# Altium PCB Driver_S_Comm.PcbDoc (part 2 of 5)
Units mm, origin at the board's own origin, x right, y up, seen from the top; angles counter-clockwise.
Board outline 200.2 x 290.2 mm, 2 copper layers (Top Layer, Bottom Layer), stack 1.371 mm thick; 518 components, 197 nets, 1403 pads, 323 vias.
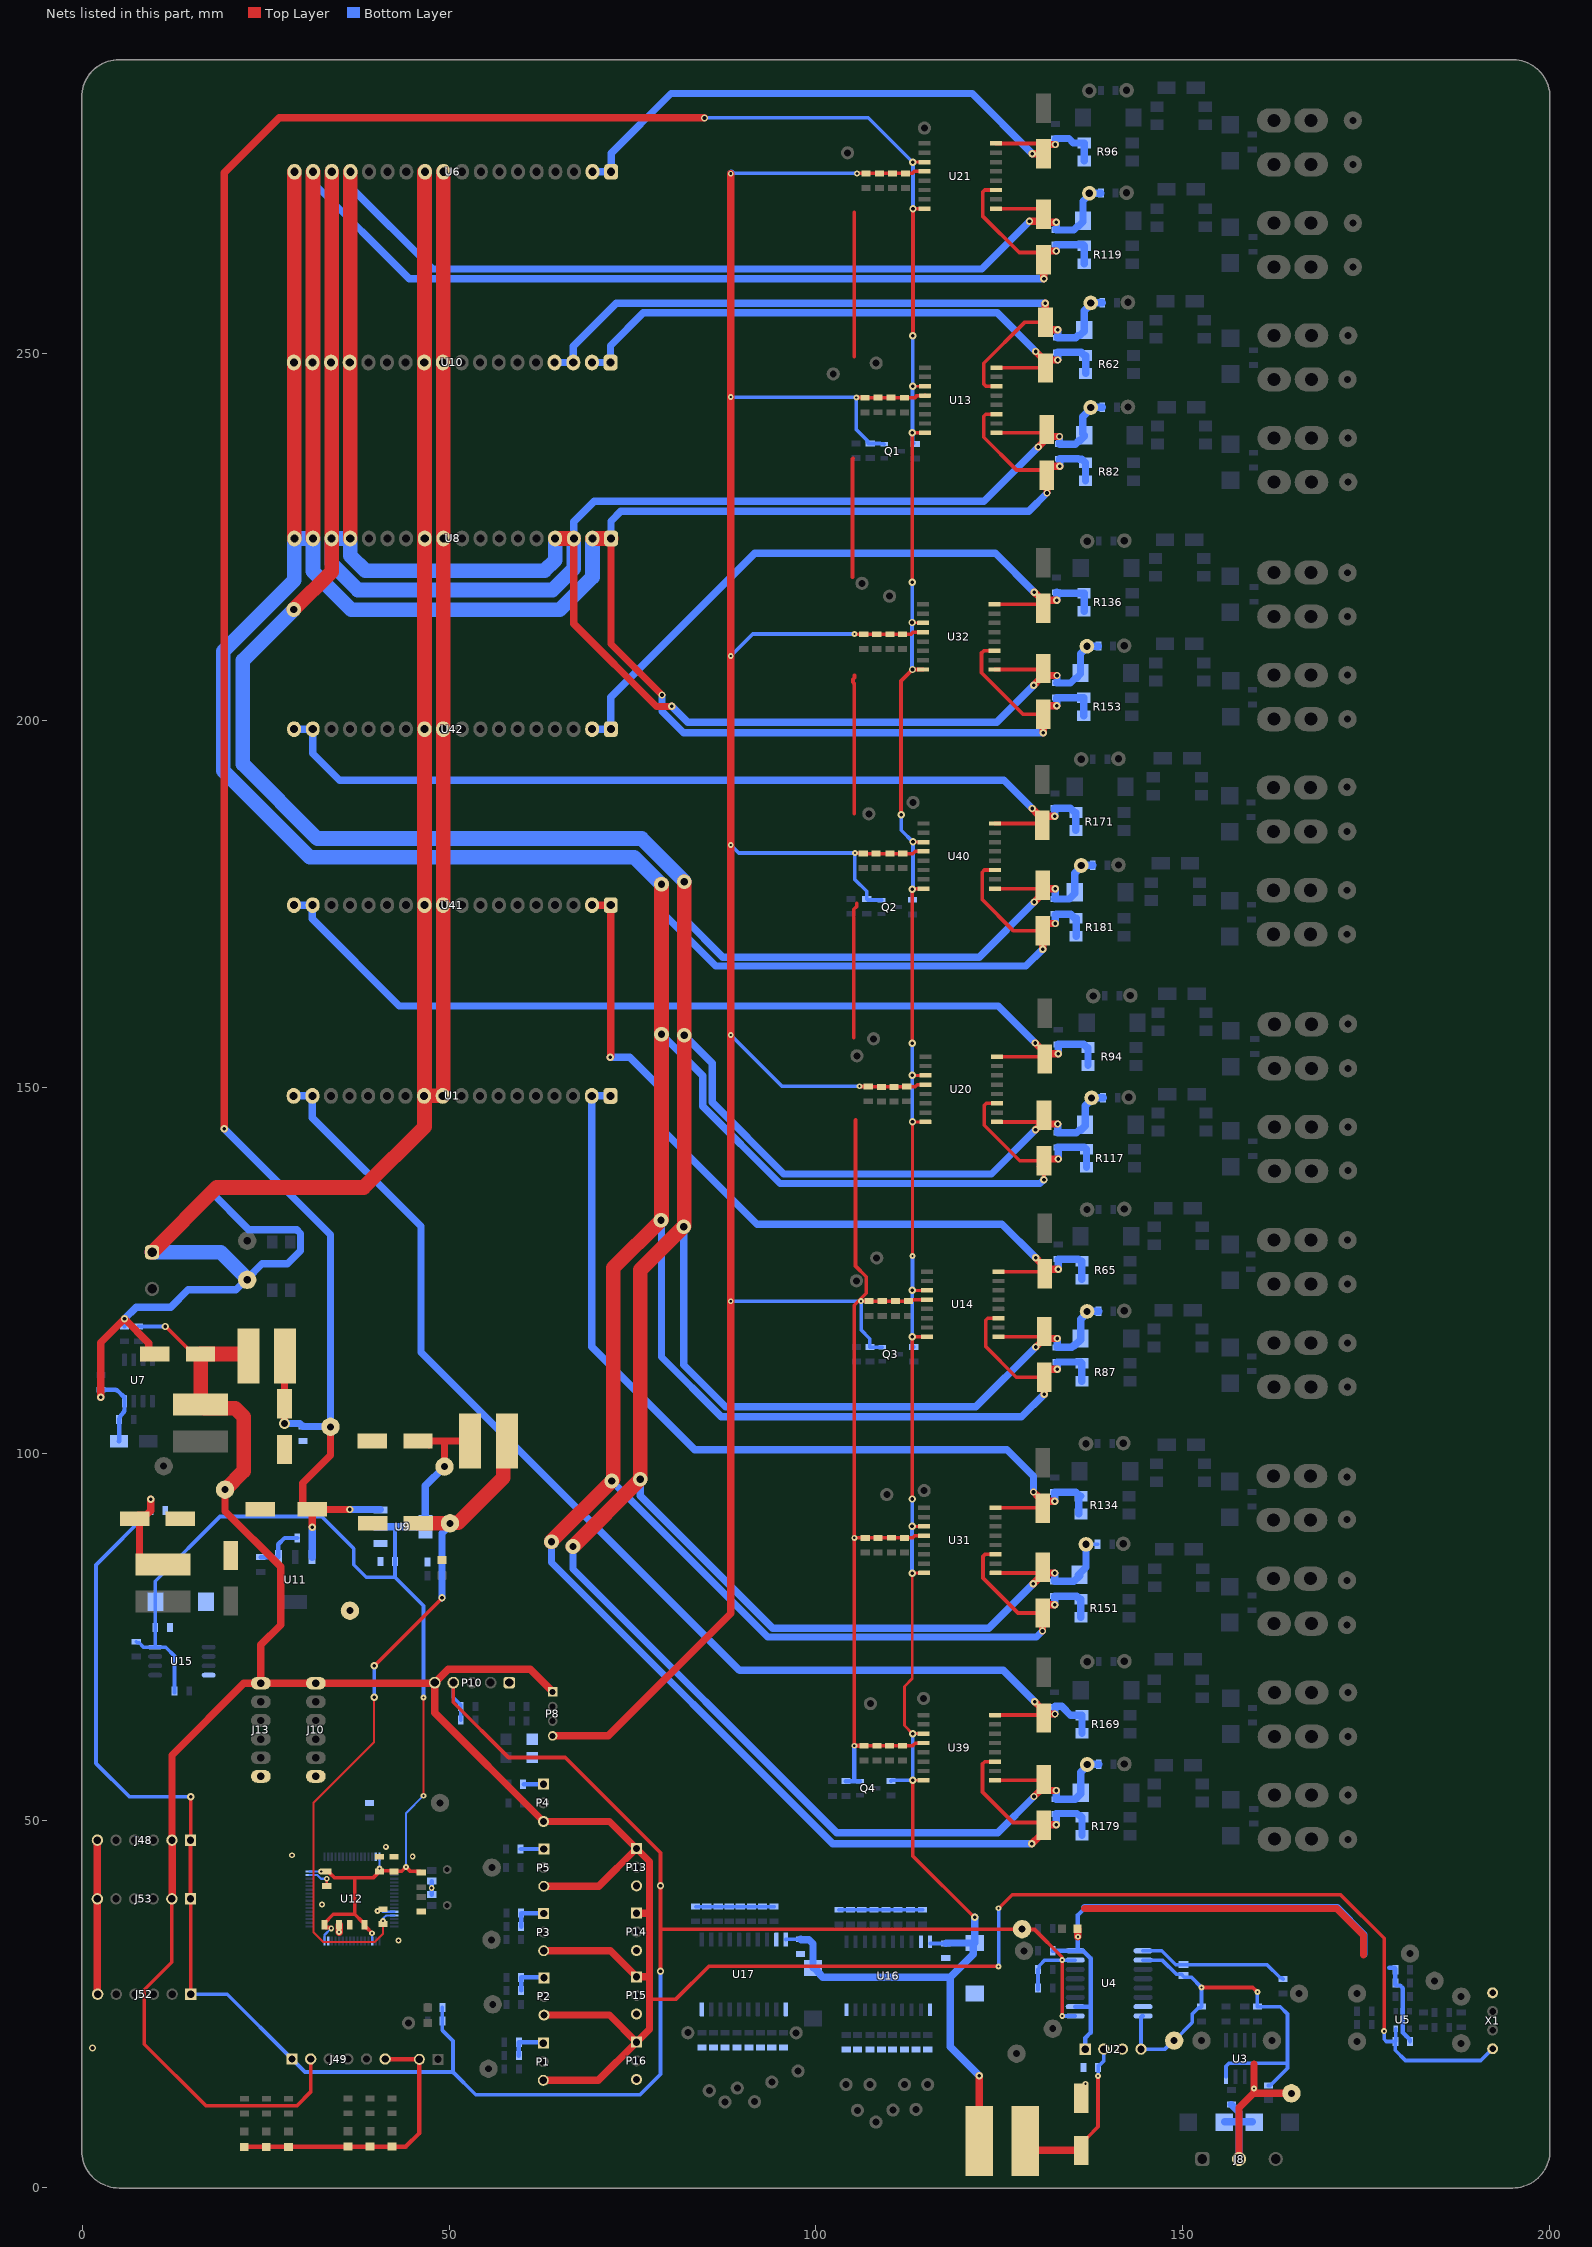
[diagram p2: the nets of this part, all layers, seen from the top]

## Part data
C1 C2 C3 C4 C6 C8 C25 C26 C27 C28 C29 C36 C40 C41 C42 C45 C46 C48 C52 C53 C54 C127: library part CAP-NON-POLAR
C9: library part CMP-1036-04552-2, "CAP CER 0.22UF 50V X7R 0805", Capacitance="0.22 μF", Manufacturer=KEMET, Package=C0805C-DN, Temperature="-55°C to +125°C", Temperature Characteristic=X7R, Temperature Coefficient=30ppm/°C, Temperature Range High=+125°C, Temperature Range Low=-55°C, Tolerance=0.1, Voltage Rating="50 V", Automotive=No, Category=Cap, ComponentLink2Description=Datasheet, ComponentLink2URL=https://content.kemet.com/datasheets/KEM_C1003_C0G_SMD.pdf, Device Class L1="Passive Components", Device Class L2=Capacitors, Device Class L3="Ceramic Capacitors", Digikey Description="CAP CER 0.22UF 50V X7R 0805", Height=0.88mm, Ipc Land Pattern Name=CAPC200125X78, Lead Free=Yes, Manufacturer Part Number=C0805C224K5RACTU, Material=Ceramic, Mouser Description="CAP CER 0.22UF 50V X7R 0805", Octopart=https://octopart.com/c0805c224k5ractu-kemet-144670, RoHS=TRUE
C33 C43 C44 C47 C49 C50 C51 C58 C60 C71 C73 C87 C88 C103 C104 C114 C117 C137 C139 C148 C150 C168 C170: library part CAP-POLAR
C38 C39: library part CAP_POL_SMD
C55 C56: library part CMP-2007-03453-2, "Chip Multilayer Ceramic Capacitors for General Purpose, 0805, 16pF, X5R, 15%, 10%, 16V", Capacitance=10uF, Case Code (Imperial)=0805, Case Code (Metric)=2012, Dielectric=X5R, Max Operating Temperature=85°C, Min Operating Temperature=-55°C, Package Quantity=1, Tolerance=10%, Voltage=16V, Case/Package=0805, Depth=1.25mm, Height=1.25mm, Lead Free="Lead Free", Length=2mm, Material=Ceramic, Mount="Surface Mount", Packaging="Tape and Reel", Radiation Hardening=No, REACH SVHC="No SVHC", Termination=SMD/SMT, Thickness=0.053inch, Voltage Rating=16V, Voltage Rating (DC)=16V, Width=1.25mm
D1 D2 D3 D4 D5 D6 D11 D22: library part LED, "WURTH ELEKTRONIK - 151031YS06000 - LED, Yellow, Through Hole, T-1 (3mm), 30 mA, 2 V, 590 nm", Manufacturer_Name="Wurth Elektronik", Mouser Part Number=710-151031YS06000, Datasheet Link=https://katalog.we-online.de/led/datasheet/151031YS06000.pdf, Geometry.Height=5.5mm, Manufacturer_Part_Number=151031YS06000, Mouser Price/Stock=https://www.mouser.co.uk/ProductDetail/Wurth-Elektronik/151031YS06000?qs=LlUlMxKIyB3xSYYW%252BcuBiQ%3D%3D
D8: "WURTH ELEKTRONIK - 151031YS06000 - LED, Yellow, Through Hole, T-1 (3mm), 30 mA, 2 V, 590 nm", Manufacturer_Name="Wurth Elektronik", Manufacturer_Part_Number=151031YS06000, Mouser Part Number=710-151031YS06000, Datasheet Link=https://katalog.we-online.de/led/datasheet/151031YS06000.pdf, Geometry.Height=5.5mm, Mouser Price/Stock=https://www.mouser.co.uk/ProductDetail/Wurth-Elektronik/151031YS06000?qs=LlUlMxKIyB3xSYYW%252BcuBiQ%3D%3D
J8: library part 691101710003, "WR-TBL Series 101 Horizontal Entry Modular, Through Hole, pitch 5mm, 3p", Manufacturer="Wurth Elektronik", Operating Temperature Max=105°C, Operating Temperature Min=-40°C, Rated Current=16A, Working Voltage=250V, Application="Pressure Clamp", Category="Terminal Blocks", ComponentLink1Description="Manufacturer Link", ComponentLink1URL=https://www.we-online.com/redexpert/article/691101710003?ad, ComponentLink2Description=Datasheet, ComponentLink2URL=https://www.we-online.com/redexpert/spec/691101710003?ad, Manufacturer Part Number=691101710003, Match Code=WR-TBL, Modularity=Yes, Mount="Through Hole", Orientation=Horizontal, Packaging=Box, PCB/Cable/Panel=PCB, Pin Number=3, Pitch=5mm
J9: "WR-TBL Series 101 Horizontal Entry Modular, THT, pitch 5mm, 2p", Manufacturer="Wurth Elektronik", Operating Temperature Max=105°C, Operating Temperature Min=-40°C, Rated Current=16A, Working Voltage=250V, Application="Pressure Clamp", Category="Terminal Blocks", ComponentLink1Description="Website Link", ComponentLink1URL=https://www.we-online.com/redexpert/article/691101710002?ad, ComponentLink2Description="Datasheet Link", ComponentLink2URL=https://www.we-online.com/redexpert/spec/691101710002?ad, Manufacturer Part Number=691101710002, Match Code=WR-TBL, Modularity=Yes, Mount="Through Hole", Number of Pins=2, Number of Rows=1, Orientation=Horizontal, Packaging=Box, Pitch=5mm
J14 J15 J16 J17 J19 J20 J21 J22 J23 J24 J25 J26 J28 J29 J30 J31 J32 J34 J35 J36 J37 J38 J39 J40 J42 J43 J44 J45 J46 J47 J50 J51: library part Klema_15_A
J48 J49 J52 J53: library part SWR25X-NRTC-S06-ST-BA
L3 L4: library part CMP-0227-00501-2, Ambient Temperature Range High=85°C, Ambient Temperature Range Low=-40°C, Current Rating=620mA, DC Resistance (DCR)=500mΩ, Inductance=270µH, Max Operating Temperature=125°C, Self Resonant Frequency=4MHz, Height=5.4mm, Length=9mm, Min Operating Temperature=-40°C, NexarPartId=24533346, Packaging=Digi-Reel®, RoHS=Compliant, Width=10mm
L5 L6 L7: library part 74477530, "WE-PD2 SMT Power Inductor, size 7850, 1000µH, 0.3A, 3.3Ω", Case/Size Code=7850, DC Resistance=2.78Ω, DC Resistance Max=3.3Ω, Inductance=1000µH, Manufacturer="Wurth Elektronik", Operating Temperature Max=125°C, Operating Temperature Min=-40°C, Rated Current=0.3A, Self Resonant Frequency=2.4MHz, Category="Unshielded Power Inductors", ComponentLink1Description="Website Link", ComponentLink1URL=https://www.we-online.com/redexpert/article/74477530?ad, ComponentLink2Description="Datasheet Link", ComponentLink2URL=https://www.we-online.com/redexpert/spec/74477530?ad, Height=4.95mm, Length=7.8mm, Manufacturer Part Number=74477530, Match Code=WE-PD2, Mount="Surface Mount", Packaging="Tape and Reel", Saturation Current=0.3A, Width=7mm, Simulation ModelName=7850_74477530_1m, Simulation ModelText=".subckt 7850_74477530_1m 1 2 / Rp 1 2 187304.915771 / Cp 1 2 4.36976277949p / Rs 1 N3 3.3 / L1 N3 2 1000u / .ends 7850_74477530_1m", Simulation PortMap=(1:1),(2:2)
P1 P2 P3 P4 P5 P13 P14 P15 P16: "WR-WTB THT Male Vertical Locking Header, pitch 2.54mm, 3p", Contact Resistance=20mOhm, Operating Temperature="-40 to +105degC", Rated Current=3A, Withstanding Voltage=1000VAC, Working Voltage=250VAC, ComponentLink1Description=Manufacturer, ComponentLink1URL=http://www.we-online.de, ComponentLink2Description=Datasheet, ComponentLink2URL=https://www.we-online.com/catalog/datasheet/61900311121.pdf, Gender=Male, Mounting Technology=THT, Packaging=Bag, Part Number=61900311121, Pin Number=3, Pitch=2.54mm, Published Date="January 2020", Publisher="Wurth Elektronik", Type=Vertical
P8: "WR-WTB Male Vertical Shrouded Header, pitch 2mm, 4p", Contact Resistance=20mOhm, Operating Temperature="-25 to +85degC", Rated Current=2A, Withstanding Voltage=800VAC, Working Voltage=125VAC, ComponentLink1Description=Manufacturer, ComponentLink1URL=http://www.we-online.de, ComponentLink2Description=Datasheet, ComponentLink2URL=https://www.we-online.com/catalog/datasheet/62000411622.pdf, Gender=Male, Mounting Technology=THT, Packaging=Bag, Part Number=62000411622, Pin Number=4, Pitch=2mm, Published Date="January 2020", Publisher="Wurth Elektronik", Type=Vertical
P9: "WR-WTB THT Male Vertical Locking Header, pitch 2.54mm, 2p", Contact Resistance=20mOhm, Operating Temperature="-40 to +105degC", Rated Current=3A, Withstanding Voltage=1000VAC, Working Voltage=250VAC, ComponentLink1Description=Manufacturer, ComponentLink1URL=http://www.we-online.de, ComponentLink2Description=Datasheet, ComponentLink2URL=https://www.we-online.com/catalog/datasheet/61900211121.pdf, Gender=Male, Mounting Technology=THT, Packaging=Bag, Part Number=61900211121, Pin Number=2, Pitch=2.54mm, Published Date="January 2020", Publisher="Wurth Elektronik", Type=Vertical
P10: "WR-PHD Pin Header, THT, Vertical, pitch 2.54mm, 1 Row, 5P", Contact Resistance=20mΩ, Manufacturer="Wurth Elektronik", Operating Temperature Max=105°C, Operating Temperature Min=-40°C, Rated Current=3A, Withstanding Voltage=500V, Working Voltage=250V, Category="Board-to-Board Connectors", ComponentLink1Description="Website Link", ComponentLink1URL=https://www.we-online.com/redexpert/article/61300511121?ad, ComponentLink2Description="Datasheet Link", ComponentLink2URL=https://www.we-online.com/redexpert/spec/61300511121?ad, Gender="Pin Header", Manufacturer Part Number=61300511121, Match Code=WR-PHD, Mount="Through Hole", Number of Pins=5, Number of Rows=1, Orientation=Vertical, Packaging=Bag, Pitch=2.54mm
Q1 Q2 Q3 Q4: library part BC847C_Infineon, "NPN Silicon AF Transistor, 45 V VCEO, 100 mA IC, SOT23, Reel, Green", Manufacturer=Infineon, ComponentLink1Description="Manufacturer URL", ComponentLink1URL=http://www.infineon.com/, ComponentLink2Description=Datasheet, ComponentLink2URL=http://www.infineon.com/dgdl/bc847series_bc848series_bc849series_bc850series.pdf?folderId=db3a304314dca389011541d30fa21656&fileId=db3a304314dca389011541d4630a1657, ComponentLink3Description="Package Specification", ComponentLink3URL=http://www.infineon.com/dgdl/SOT23-Package_Overview.pdf?folderId=db3a30431936bc4b0119532290053c66&fileId=db3a30431936bc4b0119533468123c85, fT (typ)="250Â MHz", Green=TRUE, IBM (max)="200Â mA", IC (max)="100Â mA", ICBO (max)="15Â nA", ICM (max)="200Â mA", Mounting Technology="Surface Mount", PackageDescription="3-Pin Small Outline Transistor Package, 1.3 x 2.9 mm Body, 0.95 mm Pitch", PackageReference=SOT23, PackageVersion=Apr-08, Packing=Reel, PartNumber=BC847C, Polarity=NPN, Ptot (max)="330Â mW", VCBO (max)="50Â V", VCEO (max)="45Â V", VEBO (max)="6Â V"
R1 R2 R3 R4 R5 R6 R7 R8 R9 R10 R11 R12 R13 R14 R15 R16 R17 R18 R19 R20 R21 R22 R23 R24 R25 R26 R27 R28 R29 R30 R31 R32 R33 R34 R35 R36 R37 R38 R39 R40 R41 R42 R43 R44 R45 R46 R47 R48 R49 R50 R51 R52 R53 R54 R55 R57 R58 R59 R60 R61 R62 R63 R64 R65 R66 R67 R68 R69 R70 R71 R72 R73 R74 R75 R76 R77 R78 R79 R80 R81 R82 R83 R84 R85 R86 R87 R88 R89 R90 R91 R92 R93 R94 R95 R96 R97 R104 R105 R106 R107 R108 R111 R113 R114 R115 R116 R117 R118 R119 R120 R121 R122 R123 R124 R131 R132 R133 R134 R135 R136 R137 R140 R142 R143 R144 R145 R146 R147 R148 R149 R150 R151 R152 R153 R154 R157 R159 R160 R167 R168 R169 R170 R171 R172 R173 R175 R176 R177 R178 R179 R180 R181: library part RES-CONST
R56: library part RES-CONST, "10K"
R174: library part RES-CONST, "100K"
TP1 TP2 TP3 TP4 TP5 TP6 TP7 TP8 TP9 TP10 TP11 TP12 TP13 TP14 TP15 TP16 TP17 TP18 TP19 TP20 TP21 TP22 TP23 TP24 TP25 TP26 TP27 TP28 TP29 TP30 TP31 TP32 TP33 TP34 TP35 TP36 TP37 TP38 TP39 TP40 TP41 TP42 TP43 TP44 TP45 TP46 TP47 TP48 TP49 TP50 TP51 TP52 TP53 TP54 TP55 TP56 TP57 TP58 TP59 TP60 TP61 TP62 TP63 TP64 TP65 TP66 TP67 TP68 TP69 TP70 TP71 TP72 TP73 TP74 TP77 TP78 TP79 TP83 TP84 TP85 TP86 TP87 TP88 TP98 TP99 TP100 TP101 TP102 TP103 TP104 TP105: library part TP_PCB?, "Test_Point"
U1 U6 U8 U10 U41 U42: library part DC-DC/12-18VDC
U4: library part CMP-0534-00565-1, "Quad Channel Digital Isolator, 2.5 KV rms Insulation Rating, 10 Mbps Data Rate, 50 ns Delay, Industrial, 16-pin SOIC (RW-16), Tube", Manufacturer="Analog Devices", Max Operating Temp (degreesC)=125, Code_JEDEC=MS-013-AA, ComponentLink1Description="Manufacturer URL", ComponentLink1URL=http://www.analog.com/en/index.html, ComponentLink2Description=Datasheet, ComponentLink2URL=http://www.analog.com/static/imported-files/data_sheets/ADuM1400_1401_1402.pdf, ComponentLink3Description="Package Specification", ComponentLink3URL=http://www.analog.com/static/imported-files/packages/PKG_PDF/SOIC_WIDE%20%28RW%29/RW_16.pdf, ComponentLink4Description="URL Link1", ComponentLink4URL="Product URL:http://www.analog.com/en/interface-isolation/digital-isolators/adum1401/products/product.html", ComponentLink5Description="URL Link2", ComponentLink5URL="Reference Circuit:http://www.analog.com/en/interface-isolation/digital-isolators/adum1401/products/product.html#product-recommendations", DatasheetVersion="Rev. H", Max Data Rate=10Mbps, Mounting Technology="Surface Mount", PackageDescription="16-Pin Standard Small Outline Package, Body 10.3 x 7.5 mm, Pitch 1.27 mm", PackageReference=RW-16, PackageVersion="032707-B, 03/2007", PartNumber=ADUM1401BRWZ
U5: library part MCP6001T, "IC OPAMP GP 1 CIRCUIT SOT23-5", Case/Package=SOT-23, Input Bias Current=1pA, Input Offset Voltage (Vos)=4.5mV, Max Operating Temperature=85°C, Max Supply Voltage=6V, Min Operating Temperature=-40°C, Min Supply Voltage=1.8V, Nominal Supply Current=100uA, Operating Supply Voltage=5.5V, Output Current=23mA, Package Quantity=1, Power Supply Rejection Ratio (PSRR)=86dB, Voltage Gain=112dB, Bandwidth=1MHz, Common Mode Rejection Ratio=60dB, Contact Plating=Tin, Gain Bandwidth Product=1MHz, Height=1.3mm, Lead Free="Lead Free", Length=3.1mm, Mount="Surface Mount", Number of Amplifiers=1, Number of Channels=1, Number of Circuits=1, Number of Elements=1, Number of Pins=5, Operating Supply Current=100uA, Output Current per Channel=23mA, Packaging="Tape and Reel", Radiation Hardening=No, REACH SVHC="No SVHC", Slew Rate=0.6V/µs, Unity Gain Bandwidth Product=1MHz, Voltage=6V, Width=1.8mm
U9 U11: library part AMS1117
VD1 VD18: library part ESD_Unidirect
VD2 VD3 VD6 VD7 VD10 VD11 VD14 VD15 VD20 VD21 VD24 VD25 VD28 VD29 VD32 VD33: library part Suppressor
VD4 VD5 VD8 VD9 VD12 VD13 VD16 VD17 VD22 VD23 VD26 VD27 VD30 VD31 VD34 VD35: library part ZENER
Y1: library part CMP-1749-00004-1, "Resistance Weld Thru-Hole Crystal, 12 MHz, +/-30 ppm, -20 to 70 degC, 2-Pin THD, RoHS, Bulk", Case\Package=TO-251-3, Input Capacitance="350 pF", Max Operating Temperature="150 degC", Max Power Dissipation="2.5 W", Min Operating Temperature="-55 degC", Package Quantity=70, ComponentLink1Description="Manufacturer URL", ComponentLink1URL=http://www.foxonline.com/, ComponentLink2Description=Datasheet, ComponentLink2URL=http://www.foxonline.com/pdfs/hc49slf.pdf, DatasheetVersion=Mar-15, Elements=1, Height="6.1 mm", Length="6.6 mm", Mount="Through Hole", PackageDescription="2-Pin Through Hole Device, Body 11.35 x 4.65 mm, Pitch 4.88 mm", PackageReference=FOXSLF-2, Packaging=Rail/Tube, Pins=3, Radiation Hardening=No, Rds On Max="115 mohm", REACH SVHC="No SVHC", RoHSCompliant=true, Typical Rise Time="90 ns", Width="2.3 mm"

## Via types
v1: diameter 1, hole 0.5, Top Layer to Bottom Layer, tented both sides, 118 vias
v2: diameter 0.8, hole 0.3, Top Layer to Bottom Layer, 112 vias
v3: diameter 0.8, hole 0.3, Top Layer to Bottom Layer, tented both sides, 64 vias
v4: diameter 2, hole 1, Top Layer to Bottom Layer, tented both sides, 11 vias
v5: diameter 1, hole 0.5, Top Layer to Bottom Layer, 9 vias
v6: diameter 0.8, hole 0.4, Top Layer to Bottom Layer, 5 vias
v7: diameter 0.8, hole 0.4, Top Layer to Bottom Layer, tented both sides, 2 vias
v8: diameter 0.7, hole 0.3, Top Layer to Bottom Layer, tented both sides, 1 vias
v9: diameter 1.5, hole 1, Top Layer to Bottom Layer, tented both sides, 1 vias

## Nets (pads, with @x,y where several pads share a name; then routed paths per layer and width w, separated by ;. In a path a pad name is that pad's centre, name@x,y a point inside that pad or via, vN(x,y) a via of type N, cw(c..) or ccw(c..) an arc to the next point about the centre after c; other vN are vias at no path point)
+3V3: C51.1 C52.2 J48.1 J49.1 J52.1 J53.1 L7.2 P10.4 R25.2 R28.2 R120.2 R121.2 R137.1 R142.2 TP6.1 U4.1 U4.7 | length 324.5
  Top Layer w0.5: J53.1@14.747,39.332 J48.1@14.747,47.332 14.775,47.36 v1(14.775,53.275) ; J52.1@14.782,26.332 J53.1@14.782,39.287 ; P10.4@50.582,68.807 50.582,66.139 58.11,58.611 65.839,58.611 76.075,48.375 78.83,45.62 v1(78.83,41.11) 78.83,35.198 ; v1(78.83,29.455) 78.83,35.198 ; TP6.1@128.125,35.198 78.83,35.198 ; TP6.1@128.125,35.775 128.666,35.775 128.666,35.529 129.049,35.146 129.832,35.146 133.536,31.443 133.536,31.039 v3(133.593,30.982) v3(133.593,23.362)
  Top Layer w1: v1(9.3,93.834) 9.3,92.245 8.714,91.659 7.625,91.659 C51.1@7.125,91.159 7.79,90.659 7.79,85.899 L7.2@10.96,84.899
  Bottom Layer w0.5: v1(9.3,93.834) C52.2@9.3,92.302 1.85,84.852 1.85,57.8 6.375,53.275 v1(14.775,53.275) ; J52.1@14.782,26.332 19.741,26.332 J49.1@28.577,17.496 30.348,15.725 50.415,15.725 50.525,15.615 ; R142.2@49.087,24.536 R137.1@49.087,22.696 49.087,21.396 50.525,19.958 50.525,15.725 53.638,12.612 76.017,12.612 78.83,15.425 v1(78.83,29.455) ; P10.4@50.582,68.807 50.582,66.796 51.442,65.936 51.592,65.786 R120.2@51.592,65.561 R121.2@51.592,63.711 ; R28.2@130.303,26.947 R28.2@130.303,27.172 R25.2@130.303,29.712 130.453,29.862 130.453,30.224 131.211,30.982 v3(133.593,30.982) U4.7@135.368,30.982 ; v3(133.593,23.362) U4.1@135.368,23.362
+3V3_MCU: C4.2 C5.1 C21.1 C22.1 C23.1 C24.1 C30.1 C43.1 C46.2 L6.1 R13.1 R14.1 R58.2 TP33.1 U9.2 U12.1 U12.19 U12.32 U12.48 U12.64 U15.8 | length 175.3
  Top Layer w0.3: v3(46.49,53.385) 46.49,66.765 v3(46.5,66.775)
  Top Layer w0.5: v3(32.554,43.076) C24.1@33.317,43.076 33.542,43.076 33.692,42.926 33.692,42.869 34.332,42.228 37.149,42.228 ; v3(33.927,35.311) 33.846,35.311 33.734,35.423 33.157,35.423 33.007,35.573 C23.1@33.007,35.798 33.007,36.023 34.213,37.228 37.149,37.228 ; C22.1@38.453,35.572 38.603,35.422 38.722,35.422 v3(39.507,34.637) ; C22.1@38.453,35.797 38.453,36.022 38.303,36.172 38.205,36.172 37.149,37.228 ; C30.1@40.529,43.066 39.691,42.228 37.149,42.228 ; C30.1@40.754,43.161 C21.1@42.507,43.161 ; C21.1@42.545,43.113 43.551,43.113 v3(44.12,43.682) 44.726,43.076 45.527,43.076 45.53,43.074 46.045,43.074 R58.2@46.195,42.924 ; 37.149,37.228 37.149,42.228
  Top Layer w1: C43.1@47.265,101.259 C43.1@45.765,101.759 49.308,101.759 ; TP33.1@49.38,98.269 49.38,101.687 49.308,101.759 ; L6.1@52.88,101.789 52.85,101.759 49.308,101.759
  Bottom Layer w0.3: C5.1@9.95,79.83 C5.1@9.95,79.98 ; U12.48@31.007,43.076 v3(32.554,43.076) ; U12.32@33.007,33.576 33.007,34.391 v3(33.927,35.311) ; U12.19@39.507,33.576 v3(39.507,34.637) ; v3(40.507,43.473) U12.64@40.507,45.076 ; U12.1@42.507,43.076 42.509,43.078 43.516,43.078 v3(44.12,43.682) 44.12,51.015 v3(46.49,53.385)
  Bottom Layer w0.5: R13.1@7.35,74.397 7.5,74.247 7.742,74.247 8.342,73.647 U15.8@9.918,73.647 ; R14.1@12.568,67.465 R14.1@12.568,67.659 12.568,72.448 11.37,73.647 U15.8@9.918,73.647 ; 42.63,90.059 C46.2@42.63,85.339 42.63,83.17 ; v3(46.5,66.775) 46.5,79.3 42.63,83.17 ; U15.8@9.918,73.647 9.925,73.653 C4.2@9.925,76.33 9.925,79.805 C5.1@9.95,79.83 9.95,82.649 18.76,91.459 32.628,91.459 37,87.087 37,84.88 38.71,83.17 42.63,83.17
  Bottom Layer w1: U9.2@40.66,90.059 42.63,90.059 U9.2@46.76,90.059 46.76,95.649 TP33.1@49.38,98.269
+3V3_REF: C20.2 C44.1 C45.2 L6.2 R55.2 TP32.1 U12.13 | length 97.2
  Top Layer w0.3: v5(39.775,66.8) 39.775,60.725 31.499,52.449 31.499,34.796 32.843,33.452 39.855,33.452 40.992,34.589 C20.2@40.992,35.924 C20.2@41.015,35.9 ; v3(40.992,36.324) C20.2@41.304,36.011 ; v1@49.035,80.335 v1(49.035,80.375)
  Top Layer w0.5: v1(39.8,71.125) 39.825,71.125 v1@49.035,80.335
  Top Layer w2: C44.1@45.805,90.534 TP32.1@50.111,90.534 50.207,90.63 51.255,90.63 57.401,96.776 57.401,101.31 L6.2@57.88,101.789
  Bottom Layer w0.3: v5(39.775,66.8) v5@39.8,66.825 ; v3(40.992,36.324) 41.087,36.419 41.087,36.746 41.417,37.076 U12.13@42.507,37.076
  Bottom Layer w0.5: v5@39.8,66.825 v1(39.8,71.125)
  Bottom Layer w1: v1(49.035,80.375) 49.035,89.198 50.111,90.274 TP32.1@50.111,90.534
+5: C6.2 C7.1 C8.2 C10.1 C39.1 C40.2 C42.2 C49.1 C54.2 L3.1 L4.2 R76.1 R104.1 R132.1 R154.1 TP29.1 U9.3 U11.3 U13.3 U13.8 U14.3 U14.8 U16.20 U17.20 U20.3 U20.8 U21.3 U21.8 U31.3 U31.8 U32.3 U32.8 U39.3 U39.8 U40.3 U40.8 | length 665.8
  Top Layer w0.4: v1(113.125,90.125) 113.132,90.118 114.766,90.118 U31.3@114.769,90.12 ; v1(113.125,213.35) 113.151,213.324 114.599,213.324 U32.3@114.625,213.299 ; v1(113.15,122.3) 113.159,122.309 U14.3@115.141,122.309 ; v1(113.162,151.614) U20.3@114.939,151.614 ; v2(113.175,127) v1(113.175,145.3) 113.211,145.264 U20.8@114.939,145.264 ; v1(113.198,55.5) U39.8@114.699,55.5 ; v1(113.2,245.55) 113.223,245.573 U13.3@114.887,245.573 ; v1(113.225,276.1) 113.255,276.13 114.807,276.13 U21.3@114.815,276.138 ; v1(113.243,183.444) 113.26,183.427 114.67,183.427 U40.3@114.678,183.419 ; U39.3@114.699,61.85 v1(113.198,61.85) 112.075,62.973 112.075,68.3 113.15,69.375 v1(113.15,83.75) 113.163,83.763 114.761,83.763 U31.8@114.769,83.77
  Top Layer w0.5: L4.2@27.55,113.275 L4.2@27.625,113.35 ; v5(111.65,187.125) 111.625,187.15 111.625,205.393 v1(113.181,206.949) U32.8@114.625,206.949 ; v5(113.15,156) 113.162,156.012 v1(113.162,176.998) 113.232,177.068 U40.8@114.678,177.069 ; v5(113.15,218.825) v1(113.15,239.225) 113.152,239.223 U13.8@114.887,239.223 ; v5(113.157,93.848) 113.159,93.849 v1(113.159,115.959) U14.8@115.141,115.959 ; v1@113.198,55.33 113.198,45.227 121.6,36.825 v5(121.675,36.825) ; v5(113.225,252.475) 113.254,252.504 v1(113.254,269.788) U21.8@114.815,269.788
  Top Layer w1: v1(19.35,144.35) 19.35,274.7 26.825,282.175 84.8,282.175 v1(84.825,282.15) ; v9(27.55,104.139) C39.1@27.55,106.822 L4.2@27.55,113.275 ; v1(31.33,89.979) 31.33,92.429 C49.1@31.36,92.459 ; C49.1@32.36,92.419 v1(36.45,92.419) ; C49.1@32.36,92.459 C49.1@31.36,92.459 ; TP29.1@33.83,103.339 33.83,99.832 30.04,96.042 30.04,92.959 30.54,92.459 C49.1@31.36,92.459 ; v1(122.29,15.226) 122.29,6.335 L3.1@122.3,6.325
  Bottom Layer w0.5: v1(84.825,282.15) 84.85,282.175 107.15,282.175 v1(113.225,276.1) 113.254,276.071 v1(113.254,269.788) ; U17.20@95.89,33.775 95.94,33.825 C8.2@97.927,33.825 ; R154.1@110.255,55.4 110.355,55.5 v1(113.198,55.5) v1(113.198,61.85) ; v5(111.65,187.125) 111.65,185.037 v1(113.243,183.444) 113.243,177.079 v1(113.162,176.998) R104.1@113.162,175.563 ; v1(113.15,83.75) 113.125,83.775 v1(113.125,90.125) 113.157,90.157 v5(113.157,93.848) ; v5(113.15,218.825) 113.15,213.375 v1(113.125,213.35) 113.125,207.004 v1(113.181,206.949) ; v5@113.162,155.509 v1(113.162,151.614) 113.162,145.313 v1(113.175,145.3) ; v2(113.175,127) 113.175,122.325 v1(113.15,122.3) 113.15,115.968 v1(113.159,115.959) 113.15,115.95 113.15,114.725 113.3,114.575 R132.1@113.347,114.575 ; v5(113.225,252.475) 113.225,245.575 v1(113.2,245.55) 113.19,245.54 113.19,239.265 v1(113.15,239.225) 113.181,239.194 113.181,237.92 113.323,237.778 R76.1@113.342,237.778 ; U16.20@115.615,33.25 C6.2@117.725,33.25
  Bottom Layer w1: v1(19.35,144.35) 33.83,129.87 TP29.1@33.83,103.699 33.79,103.739 C40.2@30.1,103.739 30,103.839 29.975,103.839 29.675,104.139 v9(27.55,104.139) ; U11.3@31.32,85.919 31.32,88.539 31.33,88.549 v1(31.33,89.979) ; v1(36.45,92.419) U9.3@40.6,92.419 ; C8.2@97.927,33.825 97.977,33.775 99.075,33.775 99.625,33.225 C10.1@99.625,29.925 99.775,29.925 100.625,29.075 100.625,28.944 100.918,28.651 118.35,28.651 ; C6.2@117.725,33.25 117.8,33.325 C7.1@121.675,33.325 v5(121.675,36.825) ; C7.1@121.467,33.117 121.467,31.768 118.35,28.651 ; v1(122.29,15.226) 118.35,19.166 118.35,28.651
+5V_1: C25.2 C38.1 J10.6 J13.6 J48.2 J49.2 J53.2 L4.1 L5.2 P1.3 P2.3 P3.3 P4.3 P5.3 P8.1 P10.5 P13.1 P14.1 P15.1 P16.1 R56.1 TP30.1 U5.5 X1.1 | length 476.8
  Top Layer w0.5: v1(11.3,117.375) 11.354,117.375 15.1,113.629 C38.1@16.1,113.629 ; J53.2@12.197,39.332 12.197,30.672 8.45,26.925 8.45,19.525 16.85,11.125 29.259,11.125 31.117,12.983 J49.2@31.117,17.496 ; J48.2@12.207,47.332 J48.2@12.257,47.282 ; 77.325,25.665 80.94,25.665 85.4,30.125 v2(124.925,30.125) ; v2(124.925,38.05) 126.775,39.9 171.55,39.9 177.493,33.957 v2(177.493,21.294)
  Top Layer w1: J48.2@12.207,47.332 12.207,58.932 22.012,68.737 J13.6@24.328,68.737 ; J53.2@12.257,39.375 J48.2@12.257,47.282 ; TP30.1@19.45,95.125 19.45,92.189 27.025,84.614 27.025,76.674 24.328,73.977 J13.6@24.328,68.737 ; P1.3@62.842,14.587 70.352,14.587 P16.1@75.555,19.79 ; P3.3@62.893,32.262 71.998,32.262 P15.1@75.555,28.705 77.325,28.705 ; P5.3@62.917,41.051 70.416,41.051 P13.1@75.555,46.19 ; P2.3@62.943,23.487 71.858,23.487 P16.1@75.555,19.79 ; P8.1@64.122,67.561 61.051,70.632 49.867,70.632 P10.5@48.042,68.807 ; P14.1@75.555,37.375 77.325,37.375 ; J13.6@24.328,68.737 J10.6@31.828,68.737 47.972,68.737 P10.5@48.042,68.807 ; P10.5@48.042,68.807 48.042,64.706 P4.3@62.867,49.881 71.864,49.881 P13.1@75.555,46.19 ; P16.1@75.555,19.79 77.325,21.56 77.325,25.665 77.325,28.705 ; P13.1@75.555,46.19 77.325,44.42 77.325,37.375 ; 77.325,28.705 77.325,37.375
  Top Layer w2: C38.1@16.1,113.629 C38.1@16.12,113.629 ; TP30.1@19.45,95.125 22,97.675 22,105.037 20.828,106.209 16.62,106.209 L5.2@16.12,106.709 C38.1@16.12,113.629 ; L4.1@22.625,113.35 22.346,113.629 C38.1@16.12,113.629
  Bottom Layer w0.5: R56.1@7.64,117.369 11.294,117.369 v1(11.3,117.375) ; v2(124.925,30.125) v2(124.925,38.05) ; v2(177.493,21.294) 177.493,20.184 177.786,19.891 C25.2@179.013,19.891 ; U5.5@179.063,21.618 179.063,19.941 C25.2@179.013,19.891 ; X1.1@192.275,18.9 190.675,17.3 180.4,17.3 179.013,18.687 C25.2@179.013,19.891
+5V_ISO: C9.1 R24.2 R26.2 R27.2 TP5.1 U2.4 U3.8 U4.10 U4.16 | length 63.4
  Top Layer w0.5: v3(152.592,27.25) 159.589,27.25 v3(160.207,26.632)
  Bottom Layer w0.5: U4.16@144.618,23.362 144.435,23.362 144.343,23.27 U2.4@144.343,18.847 147.599,18.847 148.754,20.002 TP5.1@148.858,20.002 151.342,22.486 151.342,23.632 152.192,24.482 152.442,24.482 R27.2@152.592,24.632 ; U4.10@144.618,30.982 144.656,30.944 147.281,30.944 149.153,29.072 149.807,29.072 150.25,28.629 151.213,28.629 v3(152.592,27.25) 152.592,24.782 152.587,24.777 R27.2@152.587,24.637 ; U3.8@155.937,15.097 155.937,16.497 156.346,16.906 164.306,16.906 ; v3(160.207,26.632) R26.2@160.207,24.632 163.306,24.632 164.306,23.632 164.306,16.906 ; R24.2@161.732,13.892 161.957,13.892 164.306,16.241 164.306,16.906
+5V_RS: C33.1 C34.2 L3.2 U2.2 | length 26.2
  Top Layer w0.5: L3.2@128.55,6.325 128.55,5.227 128.726,5.051 L3.2@130.175,3.602 ; C33.1@136.175,5.025 136.175,6.025 136.925,6.775 137.007,6.775 138.475,8.243 v3(138.475,15.2)
  Top Layer w1: L3.2@128.55,5.051 128.726,5.051 C33.1@136.175,5.051
  Bottom Layer w0.5: v3(138.475,15.2) 138.486,15.211 138.486,16.538 138.648,16.7 138.753,16.7 139.263,17.21 U2.2@139.263,18.847
+24V_1: C57.2 C58.1 R62.2 U10.1 U10.2 U13.16 | length 85.8
  Top Layer w0.5: U13.16@124.637,248.113 131.262,248.113 C58.1@131.322,248.053
  Top Layer w1: v1(130,250.3) 130.747,249.553 130.822,249.553 131.322,249.053 C58.1@131.322,248.648 ; C58.1@131.322,248.053 C58.1@131.322,248.648 ; v1(132.982,249.148) 131.822,249.148 C58.1@131.322,248.648
  Bottom Layer w1: U10.2@69.47,248.815 U10.1@72.01,248.815 72.01,251.11 76.475,255.575 124.725,255.575 v1(130,250.3) ; v1(132.982,249.148) 132.982,250.147 C57.2@132.942,250.188 136.181,250.188 136.606,249.763 R62.2@136.781,249.763 R62.2@136.781,247.313
+24V_2: C70.2 C71.1 C72.2 C73.1 C101.2 C102.2 C103.1 C104.1 C136.2 C137.1 C138.2 C139.1 C167.2 C168.1 C169.2 C170.1 R82.2 R87.2 R117.2 R119.2 R151.2 R153.2 R179.2 R181.2 U6.17 U6.18 U8.1 U8.2 U8.17 U8.18 U10.17 U10.18 U13.11 U14.11 U20.11 U21.11 U31.11 U32.11 U39.11 U40.11 | length 1178.9
  Top Layer w0.5: U32.11@124.375,209.489 122.888,209.489 122.595,209.196 122.595,206.499 128.235,200.859 C139.1@131,200.859 130.368,200.227 C139.1@130.368,199.475 ; U40.11@124.428,179.609 122.976,179.609 122.683,179.316 122.683,175.594 126.968,171.309 C170.1@130.933,171.309 C170.1@130.925,171.301 ; U39.11@124.449,58.04 123.017,58.04 122.724,57.747 122.724,53.905 126.875,49.754 C168.1@131.074,49.754 ; U31.11@124.519,86.31 123.077,86.31 122.784,86.017 122.784,83.086 127.563,78.307 C137.1@130.954,78.307 ; U21.11@124.565,272.328 123.033,272.328 122.74,272.035 122.74,268.793 127.735,263.798 C104.1@131.05,263.798 ; U13.11@124.637,241.763 123.195,241.763 122.902,241.47 122.902,238.608 127.35,234.16 130.765,234.16 C71.1@131.11,233.815 ; U20.11@124.689,147.804 123.247,147.804 122.954,147.511 122.954,144.819 127.809,139.964 C103.1@131.104,139.964 ; U14.11@124.891,118.499 123.449,118.499 123.156,118.206 123.156,114.645 127.342,110.459 C73.1@131.126,110.459 C73.1@131.15,110.435 ; C170.1@130.938,171.569 C170.1@131.683,172.314 ; v1(131.1,137.4) 131.1,138.468 130.354,139.214 C103.1@131.104,139.964 ; C103.1@131.359,140.219 C103.1@131.104,139.964
  Top Layer w1: U6.18@28.9,274.795 U6.18@28.92,274.815 ; U6.17@31.44,274.795 U6.17@31.46,274.815 ; U8.1@72.08,224.815 72.08,210.42 v1(79.025,203.475) ; v1(129.45,46.825) 130.505,47.88 130.574,47.88 131.074,48.38 C168.1@131.074,49.38 ; v1(130.9,75.85) 130.9,78.253 C137.1@130.954,78.307 130.954,78.945 131.454,79.445 v1(132.559,79.445) ; v1(130.925,168.825) C170.1@130.925,171.301 ; v1(131,198.325) C139.1@131,200.859 131,201.524 131.5,202.024 v1(132.85,202.024) ; v1(131.1,260.225) 131.1,262.748 C104.1@131.05,262.798 131.05,263.513 131.55,264.013 v1(132.77,264.013) ; C71.1@131.11,233.815 131.525,233.4 v1(131.525,231.025) ; C168.1@131.115,49.422 v1(132.764,49.422) ; C73.1@131.126,110.459 131.126,111.029 131.626,111.529 v1(132.926,111.529) ; v1(131.15,108.15) C73.1@131.15,110.435 ; C103.1@131.359,140.219 v1(133.044,140.219) ; C71.1@131.472,233.453 131.472,234.178 131.972,234.678 v1(133.262,234.678) ; C170.1@131.683,172.314 v1(132.623,172.314)
  Top Layer w2: U8.18@28.9,224.815 U6.18@28.9,274.795 ; U8.17@31.44,224.815 U6.17@31.44,274.795 ; v4(63.95,88.025) 63.95,88.075 v4(72.175,96.3) ; U8.2@69.54,224.815 U8.1@72.08,224.815 ; v4@72.4,96.525 72.4,125.375 v4(78.9,131.875) 78.95,131.925 v4(78.95,157.2) v4(78.95,177.65)
  Bottom Layer w0.5: C101.2@133.004,141.789 C101.2@133.044,141.749 ; R117.2@136.634,141.789 R117.2@136.899,141.524
  Bottom Layer w1: U6.17@31.46,274.815 31.52,274.755 31.52,273.28 44.575,260.225 v1(131.1,260.225) ; v4(63.95,88.025) 63.95,85.2 102.325,46.825 v1(129.45,46.825) ; U8.2@69.54,224.815 U8.1@72.08,224.815 72.08,227.18 73.425,228.525 129.025,228.525 v1(131.525,231.025) ; v4(72.175,96.3) 93.43,75.045 130.095,75.045 v1(130.9,75.85) ; v4(78.9,131.875) 78.95,131.825 78.95,113.221 87.121,105.05 128.05,105.05 v1(131.15,108.15) ; v4(78.95,157.2) 84.6,151.55 84.6,147.4 95.125,136.875 130.575,136.875 v1(131.1,137.4) ; v4(78.95,177.65) 78.894,177.594 78.894,174.006 86.375,166.525 128.625,166.525 v1(130.925,168.825) ; v1(79.025,203.475) 79.025,201.25 81.95,198.325 v1(131,198.325) ; v1(132.559,79.445) C136.2@132.559,80.581 ; v1(132.623,172.314) C169.2@132.623,173.554 ; C136.2@132.709,80.57 135.564,80.57 135.964,80.17 R151.2@136.139,80.17 R151.2@136.139,77.72 R151.2@136.139,77.708 ; C169.2@132.748,173.584 134.768,173.584 135.313,173.039 R181.2@135.488,173.039 R181.2@135.488,170.589 ; v1@132.764,49.795 C167.2@132.764,50.905 ; v1(132.77,264.013) C102.2@132.77,264.883 136.45,264.883 R119.2@136.595,264.738 R119.2@136.595,262.288 ; C167.2@132.774,50.975 135.619,50.975 135.899,50.695 136.074,50.695 R179.2@136.299,50.47 R179.2@136.299,48.02 ; v1(132.85,202.024) C138.2@132.85,203.114 ; C138.2@132.922,203.041 132.979,203.098 R153.2@136.525,203.098 R153.2@136.525,200.648 ; v1(132.926,111.529) C72.2@132.926,112.529 136.116,112.529 R87.2@136.281,112.364 R87.2@136.281,109.914 ; C101.2@133.004,141.789 R117.2@136.634,141.789 ; v1(133.044,140.219) C101.2@133.044,141.749 ; v1(133.262,234.678) 133.262,235.637 C70.2@133.222,235.678 135.824,235.678 135.874,235.628 136.292,235.628 R82.2@136.767,235.153 R82.2@136.767,232.703 ; R117.2@136.899,139.074 R117.2@136.899,141.524
  Bottom Layer w2: U8.2@69.54,224.815 69.54,219.54 65.1,215.1 36.68,215.1 31.44,220.34 U8.17@31.44,224.815 U8.18@28.9,224.815 28.9,219.125 19.225,209.45 19.225,193.15 31.025,181.35 75.25,181.35 v4(78.95,177.65)
+24V_3: C86.2 C88.1 R96.2 U6.1 U6.2 U21.16 | length 87.4
  Top Layer w0.5: U21.16@124.565,278.678 130.24,278.678 C88.1@130.99,277.928 ; C88.1@131.05,277.26 131.05,277.773 C88.1@131.8,278.523
  Top Layer w1: v1(129.526,277.26) C88.1@131.05,277.26 ; C88.1@131.8,278.523 v1(132.66,278.523)
  Bottom Layer w0.5: v1(132.66,278.523) v1@132.67,278.532 ; C86.2@132.67,279.333 C86.2@132.68,279.343
  Bottom Layer w1: U6.2@69.56,274.815 U6.1@72.1,274.815 72.1,277.325 80.25,285.475 121.311,285.475 v1(129.526,277.26) ; v1@132.67,278.532 C86.2@132.67,279.333 ; C86.2@132.68,279.343 134.509,279.343 135.114,278.738 R96.2@136.595,278.738 R96.2@136.595,276.288
+24V_4: C115.2 C117.1 R136.2 U32.16 U42.1 U42.2 | length 93.7
  Top Layer w0.5: U32.16@124.375,215.839 130.45,215.839 130.703,215.586 C117.1@131,215.289
  Top Layer w1: v1(129.8,217.5) 130.5,216.8 130.5,216.384 C117.1@131,215.884 ; C117.1@131,215.289 C117.1@131,215.884 ; v1(132.83,216.384) 131.5,216.384 C117.1@131,215.884
  Bottom Layer w1: U42.2@69.51,198.815 U42.1@72.05,198.815 72.05,203.175 91.675,222.8 124.5,222.8 v1(129.8,217.5) ; C115.2@132.81,217.484 132.83,217.463 v1(132.83,216.384) ; C115.2@132.98,217.339 R136.2@136.585,217.339 R136.2@136.585,214.889
+24V_5: C149.2 C150.1 R171.2 U40.16 U42.17 U42.18 | length 125.1
  Top Layer w0.5: U40.16@124.428,185.959 C150.1@130.633,185.959
  Top Layer w1: v1(129.5,188) 130.281,187.219 130.373,187.219 130.873,186.719 C150.1@130.873,186.434 ; C150.1@130.633,185.959 C150.1@130.873,185.719 C150.1@130.873,186.434 ; v1(132.566,186.934) 131.373,186.934 C150.1@130.873,186.434
  Bottom Layer w1: U42.18@28.87,198.815 U42.17@31.41,198.815 31.41,195.49 35.05,191.85 125.65,191.85 v1(129.5,188) ; v1(132.566,186.934) 132.566,187.569 132.566,188.027 C149.2@132.593,188.054 134.678,188.054 135.283,187.449 R171.2@135.458,187.449 R171.2@135.458,184.999
+24V_6: C59.2 C60.1 R65.2 U14.16 U41.1 U41.2 | length 116.4
  Top Layer w0.5: U14.16@124.891,124.849 C60.1@130.931,124.849 ; C60.1@130.59,125.968 131.236,125.322 C60.1@131.236,124.544 ; C60.1@130.938,125.307 131.125,124.951 131.304,124.612 C60.1@131.236,124.544 ; C60.1@131.891,125.199 C60.1@131.236,124.544
  Top Layer w1: U41.2@69.5,174.815 U41.1@72.04,174.815 72.04,154.15 v1(71.99,154.1) ; v1(129.975,126.725) 130.661,126.039 130.736,126.039 131.236,125.539 C60.1@131.236,124.544 ; C60.1@131.891,125.199 v1(133.046,125.199)
  Bottom Layer w0.5: C59.2@133.046,126.549 C59.2@133.056,126.559
  Bottom Layer w1: v1(71.99,154.1) 74.625,154.1 78.525,150.2 78.525,144.775 91.975,131.325 125.375,131.325 v1(129.975,126.725) ; v1(133.046,125.199) C59.2@133.046,126.549 ; C59.2@133.056,126.559 135.796,126.559 136.106,126.249 R65.2@136.281,126.249 R65.2@136.281,123.799
+24V_7: C85.2 C87.1 R94.2 U20.16 U41.17 U41.18 | length 129.6
  Top Layer w0.5: U20.16@124.689,154.154 130.884,154.154 C87.1@131.194,153.844 ; v1(129.925,156.025) v1@129.937,156.025 ; C87.1@130.368,155.594 130.444,155.594 131.194,154.844 C87.1@131.194,153.844 ; C87.1@131.899,154.549 C87.1@131.194,153.844
  Top Layer w1: v1@129.937,156.025 C87.1@130.368,155.594 ; C87.1@131.899,154.549 v1(133.074,154.549)
  Bottom Layer w0.5: U41.17@31.325,174.74 U41.17@31.4,174.815 ; C85.2@133.064,155.839 C85.2@133.074,155.829
  Bottom Layer w1: U41.18@28.86,174.815 U41.17@31.4,174.815 ; U41.17@31.325,174.74 31.325,172.95 43.2,161.075 124.875,161.075 v1(129.925,156.025) ; C85.2@133.064,155.839 136.509,155.839 136.944,155.404 R94.2@137.119,155.404 R94.2@137.119,152.954 ; v1(133.074,154.549) C85.2@133.074,155.829
+24V_8: C113.2 C114.1 R134.2 U1.1 U1.2 U31.16 | length 125.1
  Top Layer w0.3: C114.1@130.864,92.66 C114.1@130.954,92.57
  Top Layer w0.5: U31.16@124.519,92.66 C114.1@130.864,92.66
  Top Layer w1: v1(129.675,94.8) 130.405,94.07 130.454,94.07 130.954,93.57 C114.1@130.954,93.025 ; C114.1@130.954,92.57 C114.1@130.954,93.025 ; v1(132.574,93.525) 131.454,93.525 C114.1@130.954,93.025
  Bottom Layer w1: U1.1@71.99,148.815 U1.2@69.45,148.815 69.45,114.6 83.5,100.55 126.075,100.55 129.675,96.95 v1(129.675,94.8) ; v1(132.574,93.525) C113.2@132.574,94.693 ; C113.2@132.574,94.793 135.421,94.793 135.964,94.25 R134.2@136.139,94.25 ; R134.2@135.839,91.8 R134.2@135.839,94.373
+24V_9: C147.2 C148.1 R169.2 U1.17 U1.18 U39.16 | length 165.6
  Top Layer w0.5: U39.16@124.369,64.39 U39.16@124.449,64.39 130.684,64.39 C148.1@131.074,64
  Top Layer w1: v1(129.85,66.225) 130.574,65.501 130.574,64.5 130.684,64.39 C148.1@131.074,64 131.074,64.039 131.574,64.539 v1(132.615,64.539)
  Bottom Layer w1: U1.18@28.81,148.815 U1.17@31.35,148.815 31.35,145.85 46.175,131.025 46.175,113.875 89.475,70.575 89.581,70.575 89.636,70.52 125.555,70.52 v1(129.85,66.225) ; v1(132.615,64.539) 132.615,65.109 ; C147.2@132.615,65.575 133.544,65.575 134.775,64.344 R169.2@136.299,64.344 R169.2@136.299,61.894
GND: C1.1 C2.1 C3.1 C4.1 C5.2 C6.1 C7.2 C8.1 C20.1 C21.2 C22.2 C23.2 C24.2 C25.1 C28.1 C30.2 C33.2 C34.1 C36.2 C38.2 C39.2 C40.1 C41.2 C42.1 C43.2 C44.2 C45.1 C46.1 C47.2 C48.1 C49.2 C50.2 C51.2 C52.1 C53.1 C54.1 C55.2 C56.2 C64.1 C65.1 C68.1 C69.1 C95.1 C96.1 C97.1 C98.1 C124.1 C125.1 C126.1 C127.1 C155.1 C156.1 C159.1 C162.1 D1.2 D2.2 D3.2 D4.2 D5.2 D6.2 D8.2 D10.2 D11.2 J9.1 J10.1 J13.1 J48.6 J49.6 J52.6 J53.6 P1.1 P2.1 P3.1 P4.1 P5.1 P8.4 P9.2 P10.1 P13.3 P14.3 P15.3 P16.3 Q1.2 Q2.2 Q3.2 Q4.2 R4.2 R5.2 R6.2 R15.1 R16.1 R17.1 R18.1 R19.1 R20.1 R21.1 R29.1 R30.1 R31.1 R33.1 R34.1 R35.1 R37.1 R40.1 R42.1 R43.1 R44.1 R45.1 R46.1 R47.1 R48.1 R52.2 R57.1 R59.1 R66.1 R67.1 R68.1 R69.1 R70.1 R71.1 R72.1 R73.1 R74.1 R75.1 R78.1 R79.1 R80.1 R85.1 R88.2 R89.1 R90.1 R97.1 R105.1 R106.1 R107.1 R108.1 R113.2 R143.2 R144.1 R145.1 R146.1 R147.1 R159.2 R172.1 R173.1 R174.1 R175.1 TP34.1 U1.10 U1.11 U2.1 U4.2 U4.8 U5.2 U6.10 U6.11 U7.4 U8.10 U8.11 U9.1 U10.10 U10.11 U11.1 U12.12 U12.31 U12.47 U12.63 U13.4 U14.4 U15.4 U16.1 U16.10 U16.19 U17.1 U17.10 U17.19 U20.4 U21.4 U31.4 U32.4 U39.4 U40.4 U41.10 U41.11 U42.10 U42.11 VD1.2 VD18.2 X1.4 | length 1243.1
  Top Layer w0.3: v3(33.314,42.073) 33.314,41.079 C24.2@33.317,41.076
  Top Layer w0.5: 105.001,219.564 105.001,235.677 105.094,235.77 ; 105.183,156.742 105.183,174.261 105.565,174.643 105.565,175.063 ; 105.218,187.275 105.218,205.057 105.07,205.206 105.07,205.62 105.275,205.825 105.275,206.15 ; 105.225,249.589 105.225,269.275 ; v2(105.25,60.205) v2(105.25,88.555) ; v2(105.275,211.8) 105.296,211.779 106.519,211.779 C126.1@106.54,211.758 106.545,211.764 R147.1@108.315,211.764 R146.1@110.095,211.764 C127.1@111.815,211.764 ; v2(105.325,181.925) 105.348,181.902 106.44,181.902 C159.1@106.463,181.879 ; 105.425,145.525 105.402,145.502 105.402,125.623 106.874,124.151 106.874,121.896 105.25,120.272 v2(105.25,88.555) ; v2(105.525,244.05) 105.544,244.031 106.684,244.031 106.693,244.022 R73.1@108.473,244.022 113.512,244.022 113.788,244.297 114.882,244.297 U13.4@114.887,244.303 ; v6(105.625,274.603) C97.1@106.847,274.603 R108.1@108.667,274.603 R107.1@110.45,274.603 C98.1@112.22,274.603 113.175,274.603 113.44,274.868 U21.4@114.815,274.868 ; v2(105.975,150.125) 105.998,150.102 107.121,150.102 C95.1@107.144,150.079 108.904,150.079 R106.1@108.934,150.049 R105.1@110.654,150.049 110.684,150.079 C96.1@112.404,150.079 113.564,150.079 113.829,150.344 U20.4@114.939,150.344 ; v2(106.18,120.824) C68.1@107.238,120.824 R75.1@109.065,120.824 R74.1@110.868,120.824 C69.1@112.645,120.824 112.795,120.974 113.248,120.974 113.313,121.039 U14.4@115.141,121.039 ; C155.1@106.564,60.205 R173.1@108.34,60.205 111.824,60.205 113.198,60.205 113.558,60.565 114.684,60.565 U39.4@114.699,60.58 ; C159.1@106.678,181.824 113.233,181.824 113.558,182.149 U40.4@114.678,182.149 ; C127.1@111.82,211.759 112.979,211.759 113.249,212.029 U32.4@114.625,212.029 ; U31.4@114.769,88.85 113.519,88.85 113.224,88.555 C124.1@106.734,88.555 106.731,88.553 105.253,88.553 v2(105.25,88.555) ; C33.2@136.2,13.15 136.756,13.706 v3(136.756,14.125)
  Top Layer w0.6: 2.007,37.399 2.047,37.439 ; D3.2@22.081,5.526 D2.2@25.081,5.526 D1.2@28.081,5.526 42.206,5.526 D4.2@42.231,5.551 44.101,5.551 45.947,7.397 P9.2@45.947,17.456 41.317,17.456 J49.6@41.277,17.496 ; v2(105.25,60.205) C155.1@106.564,60.205
  Top Layer w1: J48.6@2.047,47.332 2.047,37.439 2.047,26.367 J52.6@2.082,26.332 ; v1(2.52,107.709) 2.52,115.199 v1(5.74,118.419) 9.051,115.108 9.051,114.129 9.551,113.629 C38.2@9.877,113.629 ; v3(35.007,34.796) C23.2@35.007,35.798 ; P8.4@64.122,61.561 71.711,61.561 88.4,78.25 v2(88.4,120.808) v2(88.4,157.119) v2(88.4,183.013) v2(88.4,208.795) v2(88.4,244.095) v6(88.4,274.55) ; D8.2@135.693,35.267 135.733,35.227 v3(135.733,34.157) ; 136.625,38.025 171.025,38.025 174.677,34.373 174.677,31.68
  Top Layer w2: J9.1@9.5,127.5 18.329,136.329 38.36,136.329 46.65,144.619 U1.11@46.65,148.815 ; U6.11@46.65,274.815 U42.11@46.65,198.815 U1.11@46.65,148.815 ; U6.10@49.19,274.815 U42.10@49.19,198.815 49.19,148.815 U1.10@49.13,148.815 U1.11@46.65,148.815
  Bottom Layer w0.3: U12.47@31.007,42.576 31.009,42.574 32.024,42.574 32.526,42.072 33.313,42.072 v3(33.314,42.073) ; v3(40.229,37.694) 40.237,37.702 40.839,37.702 40.965,37.576 U12.12@42.507,37.576
  Bottom Layer w0.5: R71.1@83.617,38.275 R78.1@85.13,38.275 R79.1@86.685,38.275 R80.1@88.195,38.275 R90.1@92.75,38.275 R97.1@94.32,38.275 ; v2(88.4,120.808) 88.416,120.824 v2(106.18,120.824) 106.18,116.895 107.37,115.705 R143.2@107.37,114.575 107.42,114.525 Q3.2@109.04,114.525 ; v2(88.4,157.119) 95.394,150.125 v2(105.975,150.125) ; v2(88.4,183.013) 89.488,181.925 v2(105.325,181.925) 105.325,178.325 106.937,176.713 R113.2@106.937,175.643 107.067,175.513 Q2.2@108.955,175.513 ; v2(88.4,208.795) 91.405,211.8 v2(105.275,211.8) ; v2(88.4,244.095) 88.445,244.05 v2(105.525,244.05) 105.525,239.66 107.04,238.145 107.04,237.92 107.19,237.77 R88.2@107.415,237.77 108.79,237.77 108.84,237.72 109.275,237.72 Q1.2@109.325,237.67 ; v6@88.453,274.603 v6(105.625,274.603) ; R33.1@103.17,37.851 R34.1@104.725,37.851 R35.1@106.27,37.851 R37.1@107.94,37.851 R42.1@109.58,37.851 R43.1@111.225,37.851 R44.1@112.915,37.851 R45.1@114.534,37.851
  Bottom Layer w0.6: v1(2.52,107.709) C41.2@2.52,108.749 4.422,108.749 cw(c4.422,108.149) 4.845,108.574 5.71,107.709 U7.4@5.735,107.184 5.735,106.053 cw(c5.135,106.053) 5.614,105.692 5.105,105.016 C36.2@5.005,104.691 5.005,101.734 D10.2@4.98,101.709 ; R57.1@5.74,117.369 v1(5.74,118.419) ; C53.1@24.31,85.919 U11.1@26.72,85.919 26.72,87.689 27.57,88.539 C54.1@29.29,88.539 ; C56.2@47.627,39.913 v7(47.627,40.831) C55.2@47.627,41.749 ; C1.1@59.522,17.957 R4.2@59.522,19.787 62.722,19.787 P1.1@62.842,19.667 ; R30.1@59.757,46.131 P5.1@62.917,46.131 ; C3.1@59.823,35.552 R6.2@59.823,37.384 62.851,37.384 P3.1@62.893,37.342 ; C2.1@59.826,26.832 R5.2@59.826,28.62 62.89,28.62 P2.1@62.943,28.567 ; R29.1@60.187,54.961 P4.1@62.867,54.961 ; v2(105.25,60.205) 105.25,55.38 R159.2@104.105,55.38 104.135,55.35 Q4.2@106.025,55.35 ; R40.1@132.303,32.252 U4.8@135.368,32.252 ; U4.2@135.368,24.632 137.463,24.632 ; 136.625,38.025 135.733,37.133 v3(135.733,34.157) 135.733,32.298 135.687,32.252 U4.8@135.368,32.252 ; U2.1@136.723,18.847 136.723,20.357 137.463,21.097 137.463,24.632 ; 178.182,29.918 178.919,29.918 179.019,29.818 C28.1@179.019,29.657 179.019,27.844 R52.2@179.013,27.838 179.013,27.613 179.113,27.513 179.661,27.513 180.013,27.162 U5.2@180.013,24.018 180.013,21.114 180.439,20.688 180.441,20.688 181.013,20.116 C25.1@181.013,19.891 ; U4.8@135.368,32.252 135.387,32.233 136.462,32.233 137.463,31.232 137.463,24.632
  Bottom Layer w1: v1(5.74,118.419) 7.321,120 12.025,120 14.4,122.375 20.95,122.375 22.475,123.9 24.5,125.925 27.962,125.925 29.73,127.693 29.73,130.057 29.207,130.58 22.695,130.58 17.35,135.925 ; v6(88.4,274.55) v6@88.453,274.603 ; 136.686,38.135 171.086,38.135 174.738,34.484 174.738,31.79
  Bottom Layer w2: J9.1@9.5,127.5 18.875,127.5 C47.2@22.475,123.9
  other v3: 41.375,46.425
  other v5: 1.375,19
  other v6: 32.675,38.576 45.037,45.096 28.575,45.275
  other v7: 43.104,33.67
GND_2: C9.2 J8.2 R38.1 R41.1 TP20.1 U2.3 U3.5 U4.9 U4.15 ZD1.2 ZD2.2 | length 52.9
  Top Layer w1: J8.2@157.702,3.862 157.702,10.847 159.747,12.892 ; 159.747,16.805 v3(159.747,13.492) 159.747,12.892 ; TP20.1@164.842,12.822 159.817,12.822 159.747,12.892
  Bottom Layer w0.5: U4.9@144.618,32.252 147.172,32.252 149.07,30.354 C9.2@150.147,30.354 153.857,30.354 161.521,30.354 163.313,28.562 163.562,28.562 R38.1@163.712,28.412 ; ZD2.2@155.687,8.862 ZD2.2@155.774,8.949 ; v3(159.747,13.492) U3.5@159.747,15.097
  Bottom Layer w1: ZD2.2@155.774,8.949 157.702,8.949 ; R41.1@156.662,11.292 156.687,11.292 156.887,11.092 156.887,11.067 157.702,10.252 157.702,8.949 ; J8.2@157.702,3.862 157.702,8.949 ; ZD1.2@159.512,8.949 157.702,8.949
GND_-24V_1: C57.1 C58.2 C61.2 C62.1 U10.3 U10.4 U13.14 VD4.2 | length 102.9
  Top Layer w0.5: U13.14@124.637,245.573 123.195,245.573 122.902,245.865 122.902,248.716 128.461,254.276 C58.2@131.322,254.276
  Top Layer w1: v1(131.3,256.9) 131.3,254.298 C58.2@131.322,254.276 131.322,253.768 131.822,253.268 v1(132.972,253.268)
  Bottom Layer w1: U10.4@64.39,248.815 U10.3@66.93,248.815 66.93,251.03 72.8,256.9 v1(131.3,256.9) ; v1(132.972,253.268) 132.972,252.218 C57.1@132.942,252.188 135.42,252.188 135.715,252.483 136.006,252.483 136.606,253.083 C61.2@136.606,253.233 136.606,255.883 137.481,256.758 VD4.2@137.481,256.931 137.494,256.943 139.044,256.943 C62.1@139.056,256.955
GND_-24V_2: C70.1 C71.2 C72.1 C73.2 C80.2 C82.1 C83.2 C84.1 C101.1 C102.1 C103.2 C104.2 C109.2 C110.2 C111.1 C112.1 C136.1 C137.2 C138.1 C139.2 C140.2 C141.1 C142.2 C143.1 C167.1 C168.2 C169.1 C170.2 C171.2 C172.1 C173.2 C174.1 U6.15 U6.16 U8.3 U8.4 U8.15 U8.16 U10.15 U10.16 U13.9 U14.9 U20.9 U21.9 U31.9 U32.9 U39.9 U40.9 VD8.2 VD9.2 VD16.2 VD17.2 VD26.2 VD27.2 VD34.2 VD35.2 | length 1152.2
  Top Layer w0.5: U32.9@124.375,206.949 130.867,206.949 C139.2@131,207.082 ; U40.9@124.428,177.069 C170.2@130.47,177.069 ; U39.9@124.449,55.5 C168.2@130.597,55.5 ; U31.9@124.519,83.77 130.204,83.77 C137.2@130.829,84.395 ; U21.9@124.565,269.788 C104.2@130.49,269.788 ; U13.9@124.637,239.223 131.019,239.223 C71.2@131.472,239.676 ; U20.9@124.689,145.264 130.354,145.264 C103.2@131.104,146.014 ; U14.9@124.891,115.959 130.403,115.959 C73.2@131.126,116.682 C73.2@131.126,116.484 ; v1(129.975,114.575) v1@130.019,114.575 ; C137.2@130.954,84.27 130.954,84.52 C137.2@130.954,84.53 ; C73.2@131.126,115.682 C73.2@131.126,116.484 ; C73.2@131.876,115.734 C73.2@131.126,116.484
  Top Layer w1: v4(28.825,215.125) v4@28.825,215.15 ; U6.16@33.98,274.795 U6.16@34,274.815 ; U6.15@36.52,274.795 U6.15@36.54,274.815 ; U8.3@67,224.815 67,213.175 78.275,201.9 80.35,201.9 v1(80.375,201.925) ; v1(129.136,268.048) 130.686,268.048 C104.2@131.05,268.413 ; v1(129.65,82.275) 130.405,83.03 130.713,83.03 131.454,83.77 v1(132.559,83.77) ; v1(129.725,204.825) 130.482,205.582 130.5,205.582 131,206.082 C139.2@131,206.644 ; v1(129.75,53.28) 130.835,54.365 131.074,54.365 C168.2@131.074,55.603 ; v1(129.79,175.254) 130.433,175.897 130.433,177.032 130.47,177.069 C170.2@130.933,177.532 131.396,177.069 v1(132.623,177.069) ; v1(129.961,144.189) 130.459,144.687 130.604,144.687 131.104,145.187 131.104,146.014 C103.2@131.104,146.187 ; v1@130.019,114.575 C73.2@131.126,115.682 ; v1(130.329,237.278) 130.972,237.921 130.972,239.176 C71.2@131.019,239.223 ; C137.2@130.954,84.27 C137.2@131.3,83.925 ; C139.2@131,207.082 C139.2@131,206.644 ; C104.2@131.05,269.021 C104.2@131.05,268.413 ; C168.2@131.074,54.603 131.574,54.103 v1(132.766,54.103) ; C103.2@131.234,145.359 131.604,144.989 v1(132.974,144.989) ; C71.2@131.472,239.676 131.472,239.218 131.972,238.718 v1(133.222,238.718) ; C73.2@131.876,115.734 v1(132.926,115.734) ; v1(132.78,267.913) 131.55,267.913 C104.2@131.05,268.413 ; v1(132.88,206.144) 131.5,206.144 C139.2@131,206.644
  Top Layer w2: v4@28.825,215.15 33.98,220.305 U8.16@33.98,224.815 U6.16@33.98,274.795 ; U8.15@36.52,224.815 U6.15@36.52,274.795 ; U8.4@64.46,224.815 U8.3@67,224.815 ; v4(66.9,87.375) v4(76.075,96.55) 76.075,125.075 82.075,131.075 v4(82.075,157.075) v4(82.075,178)
  Bottom Layer w0.5: VD26.2@136.839,87.66 136.851,87.673 138.401,87.673 C141.1@138.414,87.685
  Bottom Layer w1: U6.15@36.54,274.815 36.54,272.76 47.75,261.55 122.637,261.55 v1(129.136,268.048) ; v4(66.9,87.375) 66.9,84.3 102.875,48.325 124.795,48.325 v1(129.75,53.28) ; U8.3@67,224.815 67,227.1 69.775,229.875 122.927,229.875 v1(130.329,237.278) ; v4(76.075,96.55) 76.068,96.543 76.068,94.307 94.15,76.225 123.6,76.225 v1(129.65,82.275) ; v1(80.375,201.925) 82.55,199.75 124.65,199.75 v1(129.725,204.825) ; v4(81.975,130.975) 81.975,112.125 87.675,106.425 121.825,106.425 v1(129.975,114.575) ; v4(82.075,157.075) 85.875,153.275 85.875,147.925 95.625,138.175 123.947,138.175 v1(129.961,144.189) ; v4(82.075,178) 82.025,177.95 82.025,173.025 87.325,167.725 122.261,167.725 v1(129.79,175.254) ; v1(132.559,83.77) 132.559,82.63 C136.1@132.584,82.605 ; C169.1@132.573,175.654 C169.1@132.623,175.654 ; v1(132.623,177.069) C169.1@132.623,175.654 ; C136.1@132.709,82.63 135.209,82.63 135.964,83.385 C140.2@135.964,83.535 ; v1(132.766,54.103) 132.766,52.923 C167.1@132.774,52.915 135.384,52.915 136.124,53.655 136.124,56.607 136.999,57.482 VD34.2@136.999,57.65 137.011,57.663 138.561,57.663 C172.1@138.574,57.675 ; v1(132.78,267.913) 132.78,266.893 C102.1@132.77,266.883 135.16,266.883 135.67,267.393 135.82,267.393 136.42,267.993 C110.2@136.42,268.143 136.42,270.84 137.295,271.715 VD17.2@137.295,271.888 137.307,271.9 138.858,271.9 C112.1@138.87,271.912 ; v1(132.88,206.144) 132.88,205.144 C138.1@132.85,205.114 134.721,205.114 135.34,205.733 135.49,205.733 136.09,206.333 C142.2@136.09,206.483 136.09,209.085 136.965,209.96 VD27.2@136.965,210.128 136.977,210.14 138.528,210.14 C143.1@138.54,210.153 ; v1(132.926,115.734) C72.1@132.926,114.529 134.901,114.529 135.106,114.734 135.256,114.734 136.106,115.584 C83.2@136.106,115.734 136.106,118.381 136.981,119.256 VD9.2@136.981,119.424 136.993,119.436 138.543,119.436 C84.1@138.556,119.449 ; v1(132.974,144.989) 132.974,143.819 C101.1@133.004,143.789 135.538,143.789 135.894,144.145 136.124,144.145 136.724,144.745 136.724,147.486 137.599,148.361 VD16.2@137.599,148.534 137.611,148.546 139.161,148.546 C111.1@139.174,148.559 ; v1(133.222,238.718) 133.222,237.678 135.402,237.678 135.842,238.118 135.992,238.118 136.592,238.718 C80.2@136.592,238.868 136.392,239.068 136.392,241.43 137.481,242.519 VD8.2@137.481,242.673 137.494,242.685 139.044,242.685 C82.1@139.056,242.697 ; C140.2@135.744,83.465 136.839,84.56 VD26.2@136.839,87.66 ; C174.1@137.763,180.254 137.75,180.241 136.2,180.241 VD35.2@136.188,180.229 136.188,180.056 135.313,179.181 C173.2@135.313,176.564 135.313,176.414 134.553,175.654 C169.1@132.623,175.654